# Altium PCB TP5400电源板-v1.1.pcbdoc
Units mil, origin at the board's own origin, x right, y up, seen from the top; angles counter-clockwise.
Board outline 629.92 x 807.09 mil, 2 copper layers (Top Layer, Bottom Layer), stack 62.205 mil thick; 18 components, 11 nets, 48 pads, 36 vias.
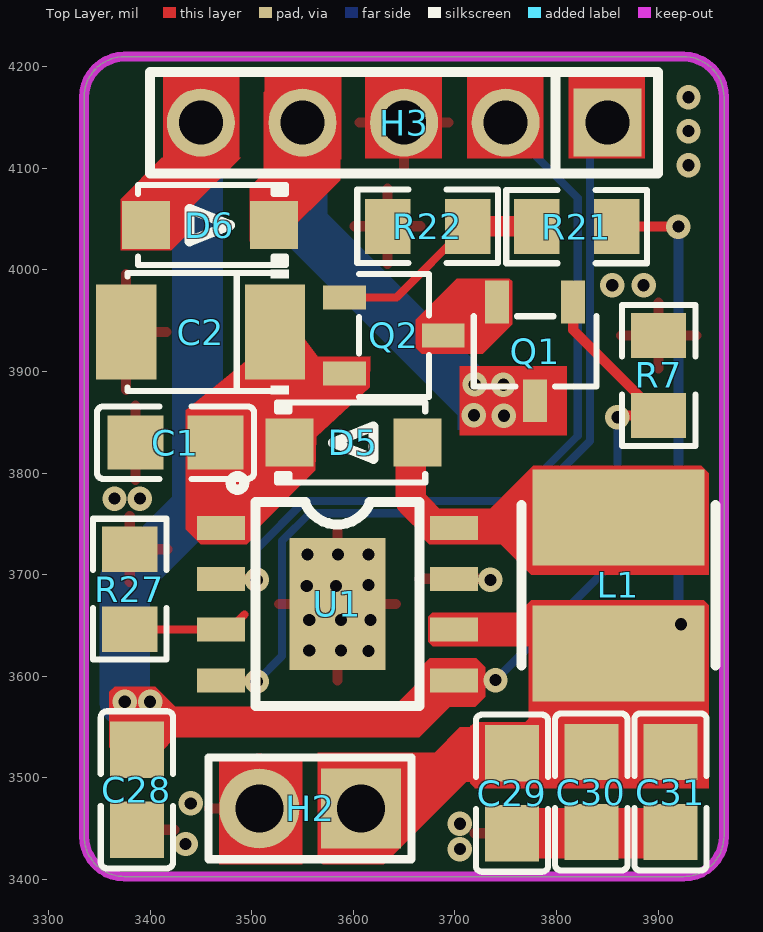
[diagram p0: Top Layer view]
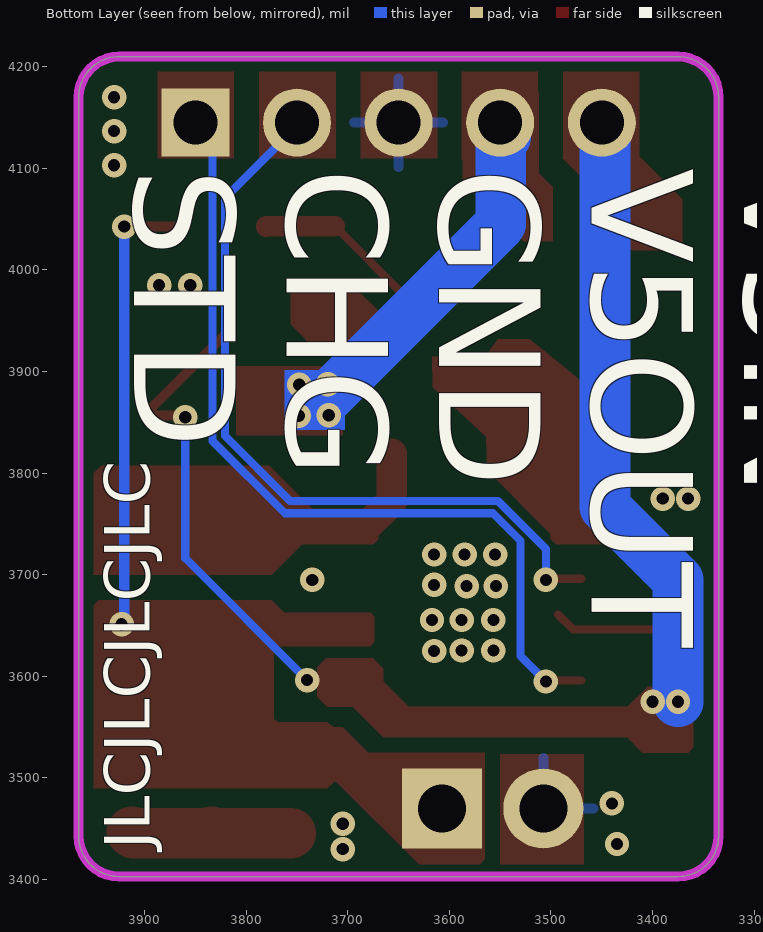
[diagram p1: Bottom Layer view, seen from below]

## Layer stack, top to bottom
Top Solder Mask Layer: solder mask 0.394, Dk 3.3
Top Layer: signal copper 1.378
Dielectric2: surface 59.449, FR4, Dk 4.5
Bottom Layer: signal copper 1.378
Bottom Solder Mask Layer: solder mask 0.394, Dk 3.3

## Board outline
3375,4210 3924.92,4210 cw(c3924.92,4170) 3964.92,4170 3964.92,3442.91 cw(c3924.92,3442.91) 3924.92,3402.91 3375,3402.91 cw(c3375,3442.91) 3335,3442.91 3335,4170 cw(c3375,4170)

## Design rules (kind name [scope] priority, off if disabled: settings)
BoardOutlineClearance copperThickness1oz [All] p0: genericclearance=10 ignorepadtopadclearanceinfootprint=FALSE except(0: Arc-SplitContinuation Track-SplitContinuation SMDPad-SplitContinuation THPad-SplitContinuation Via-SplitContinuation Fill-SplitContinuation Poly-SplitContinuation Region-SplitContinuation Text-SplitContinuation)
BoardOutlineClearance copperThickness2oz [All] p0: genericclearance=10 ignorepadtopadclearanceinfootprint=FALSE except(0: Arc-SplitContinuation Track-SplitContinuation SMDPad-SplitContinuation THPad-SplitContinuation Via-SplitContinuation Fill-SplitContinuation Poly-SplitContinuation Region-SplitContinuation Text-SplitContinuation)
BoardOutlineClearance Plane_innerPlane [All] p0: genericclearance=10 ignorepadtopadclearanceinfootprint=FALSE except(0: Arc-SplitContinuation Track-SplitContinuation SMDPad-SplitContinuation THPad-SplitContinuation Via-SplitContinuation Fill-SplitContinuation Poly-SplitContinuation Region-SplitContinuation Text-SplitContinuation)
BoardOutlineClearance Copper_copperRegion [All] p0: genericclearance=10 ignorepadtopadclearanceinfootprint=FALSE except(0: Arc-SplitContinuation Track-SplitContinuation SMDPad-SplitContinuation THPad-SplitContinuation Via-SplitContinuation Fill-SplitContinuation Poly-SplitContinuation Region-SplitContinuation Text-SplitContinuation)
BoardOutlineClearance otherClearance [All] p0: genericclearance=10 ignorepadtopadclearanceinfootprint=FALSE except(0: Arc-SplitContinuation Track-SplitContinuation SMDPad-SplitContinuation THPad-SplitContinuation Via-SplitContinuation Fill-SplitContinuation Poly-SplitContinuation Region-SplitContinuation Text-SplitContinuation)
Clearance copperThickness1oz [All] p1: gap=7 ignorepadtopadclearanceinfootprint=FALSE
Clearance copperThickness2oz [All] p1: gap=7 ignorepadtopadclearanceinfootprint=FALSE
Clearance Plane_innerPlane [All] p1: gap=7 ignorepadtopadclearanceinfootprint=FALSE
Clearance Copper_copperRegion [All] p1: gap=7 ignorepadtopadclearanceinfootprint=FALSE
Clearance otherClearance [All] p1: gap=7 ignorepadtopadclearanceinfootprint=FALSE
DiffPairsRouting differentialPair [All] p1: maxuncoupledlength=10 minlimit=6 maxlimit=Infinity mostfreqgap=6 toplayer_minwidth=5 toplayer_prefwidth=10 toplayer_maxwidth=100 bottomlayer_minwidth=5 bottomlayer_prefwidth=10 bottomlayer_maxwidth=100
PasteMaskExpansion pasteMaskExpansion [All] p1: expansion=0
PlaneConnect innerPlane [All] p1: planeconnectstyle=Relief reliefexpansion=20 reliefentries=4 reliefconductorwidth=10 reliefairgap=10
PolygonConnect copperRegion [All] p1: connectstyle=Relief reliefentries=4 reliefconductorwidth=10 polygonreliefangle="90 Angle" airgapwidth=10
RoutingVias viaSize [All] p1: viastyle="Through Hole" holewidth=12.0078 minholewidth=11.811 maxholewidth=248.0314 width=12.0078 minwidth=11.811 maxwidth=248.0314
SolderMaskExpansion solderMaskExpansion [All] p1: useseparateexpansions=TRUE expansion=2 expansionbottom=2
Width copperThickness1oz [All] p1: maxlimit=100 minlimit=5 preferedwidth=10
Width copperThickness2oz [All] p1: maxlimit=100 minlimit=8 preferedwidth=10

## Components (designator, comment, footprint, x,y, rotation, side; value= is the part's Value field where it differs from the comment)
C1 "" C0805_1 3425,3830 r0 top
C2 "" CASE-B_3528 3449.7,3938.89 r180 top
C28 "" C0805_1 3387.05,3488.37 r270 top
C29 "" C0805_1 3756.26,3485 r90 top
C30 "" C0805_1 3834.25,3486.18 r90 top
C31 "" C0805_1 3912.26,3486.18 r90 top
D5 "" SOD-123FL_L2.8-W1.8-LS3.7-RD 3600,3830 r0 top
D6 "" SOD-123FL_L2.8-W1.8-LS3.7-RD 3458.78,4044.08 r180 top
H2 "" HDR-TH_2P-P2.54-V-M_1 3557.48,3470 r180 top
H3 "" HDR-TH_5P-P2.54-V-M_1 3650,4145 r180 top
L1 "" IND-SMD_L4.5-W4.0_SCCD43 3861.04,3689.67 r270 top
Q1 "" SOT-23-3_L2.9-W1.6-P1.90-LS2.8-BR_1 3779.04,3920 r90 top
Q2 "" SOT-23-3_L2.9-W1.6-P1.90-LS2.8-BR_1 3640,3935.58 r180 top
R7 "" R0805_1 3900.57,3896.21 r270 top
R21 "" R0805_1 3819.88,4042.7 r180 top
R22 "" R0805_1 3673.23,4042.99 r180 top
R27 "" R0805_1 3380,3685.82 r270 top
U1 "" ESOP-8_L4.9-W3.9-P1.27-LS6.0-BL-EP 3584.43,3671.09 r270 top

## Footprints (in the part's own frame and the unit in brackets; to place one, negate y for a bottom-side part, rotate by r counter-clockwise, add the part's x,y. Pads: shape width x height; smd on the part's side, far side on the other; paste and mask are expansions set on the pad)
C0805_1 [mm]
  rect 1.41x1.35 smd: 1(-1,0) 2(1,0)
  silkscreen extent -1.96,-0.9 1.96,0.9
CASE-B_3528 [mil]
  rect 59.3x93.54 smd: 1(-73.25,0) 2(73.25,0)
  silkscreen extent -87,-61 72,61
ESOP-8_L4.9-W3.9-P1.27-LS6.0-BL-EP [mm]
  rect 0.6x1.2 smd: 1(-1.905,-2.908) 2(-0.635,-2.908) 3(0.635,-2.908) 4(1.905,-2.908) 5(1.905,2.908) 6(0.635,2.908) 7(-0.635,2.908) 8(-1.905,2.908)
  rect 3.3x2.4 smd: 9(0,0)
  silkscreen extent -3.2,-2.67 2.55,2.05
HDR-TH_2P-P2.54-V-M_1 [mm]
  rect 2x2 hole 1.2: 1(-1.27,0)
  round 2 hole 1.2: 2(1.27,0)
  silkscreen extent -2.54,-1.27 2.54,1.27
HDR-TH_5P-P2.54-V-M_1 [mm]
  rect 1.7x1.7 hole 1.1: 1(-5.08,0)
  round 1.7 hole 1.1: 2(-2.54,0) 3(0,0) 4(2.54,0) 5(5.08,0)
  silkscreen extent -6.35,-1.27 6.35,1.27
IND-SMD_L4.5-W4.0_SCCD43 [mm]
  rect 2.4x4.3 smd: 1(-1.7,0) 2(1.7,0)
  silkscreen extent -2,-2.43 2,2.43
R0805_1 [mm]
  rect 1.133x1.377 smd: 1(-1,0) 2(1,0)
  silkscreen extent -1.76,-0.92 1.76,0.92
SOD-123FL_L2.8-W1.8-LS3.7-RD [mm]
  rect 1.2x1.2 smd: 1(-1.6,0) 2(1.6,0)
  silkscreen extent -1.9,-1 1.8,1
SOT-23-3_L2.9-W1.6-P1.90-LS2.8-BR_1 [mm]
  rect 1.07x0.6 smd: 1(1.235,-0.95) 2(1.235,0.95) 3(-1.235,0)
  silkscreen extent -0.88,-1.54 0.88,1.54

## Via types
v1: diameter 24.02, hole 12.01, Top Layer to Bottom Layer, 36 vias

## Nets (pads, with @x,y where several pads share a name; then routed paths per layer and width w, separated by ;. In a path a pad name is that pad's centre, name@x,y a point inside that pad or via, vN(x,y) a via of type N, cw(c..) or ccw(c..) an arc to the next point about the centre after c; other vN are vias at no path point)
$1N374: D5.2 L1.1 U1.8 | length 83.8
  Top Layer w30: D5.2@3656.75,3819.3 3656.75,3772.19 U1.8@3682.7,3746.24
$1N391: R27.2 U1.3 | length 119.4
  Top Layer w8: R27.2 3380.36,3646.09 U1.3 3478.03,3646.09 3493.03,3661.09
$1N4929: Q2.1 R21.2 R22.1 | length 218.3
  Top Layer w8: Q2.1 3642.58,3972.98 R22.1
  Top Layer w20: R22.1 3780.21,4042.99 R21.2
BAT5V: C1.2 C2.1 D5.1 Q2.2 U1.1
BAT5V_OUT: Q1.2 Q2.3
CHRG: H3.2 U1.2 | length 767
  Top Layer w8: U1.2 3503.91,3696.09 v1(3505,3695)
  Bottom Layer w8: v1(3505,3695) 3505,3725.41 3552.17,3772.58 3756.76,3772.58 3820.99,3836.81 3820.99,4070.7 H3.2@3746.69,4145
GND: C1.1 C2.2 C28.2 C29.1 C30.1 C31.1 H2.2 H3.3 R7.1 R22.2 R27.1 U1.7 U1.9 | length 158.2
  Top Layer w50: C29.1 C30.1@3833.07,3445.63 ; C30.1 C30.1@3833.07,3445.63 ; C31.1 3911.08,3445.63 C30.1@3833.07,3445.63
  other v1: 3705,3430 3435,3435 3705,3455 3440,3475 3556.71,3625.5 3588.01,3625.5 3615,3625 3556.71,3655.47 3588.01,3655.47 3617.08,3655.47 3554.24,3688.88 3583.01,3688.88 3615,3690 3735,3695 3555,3720 3585,3720 3615,3720 3365,3775 3390,3775 3855,3985 3885.75,3985 3930,4103.13 3930,4136.67 3930,4170
STDBY: H3.1 U1.4 | length 846.2
  Top Layer w8: U1.4 3503.91,3596.09 v1(3505,3595)
  Bottom Layer w8: v1(3505,3595) 3530,3620 3530,3733.44 3557.14,3760.58 3761.73,3760.58 3832.99,3831.84 3832.99,4132.48 H3.1@3845.36,4144.85
USB5V: C28.1 D6.2 H3.5 Q1.1 R7.2 U1.5 | length 1114.1
  Top Layer w10: U1.5@3722.2,3595.65 3739.32,3595.65 v1(3740,3596.33) ; Q1.1 3816.44,3940.97 R7.2 3861.84,3856.84 v1(3860,3855)
  Bottom Layer w8: v1(3740,3596.33) 3860,3716.33 v1(3860,3855)
  Bottom Layer w50: v1(3375,3575) 3375,3695 3446.69,3766.69 H3.5@3446.69,4145
  other v1: 3400,3575
V5OUT: D6.1 H3.4 Q1.3 | length 329.6
  Bottom Layer w50: H3.4@3544.66,4130.89 3549.45,4126.1 3549.45,4045.45 3720.72,3874.19
  other v1: 3748.27,3856.49 3718.72,3857.02 3719.52,3887.36 3747.73,3887.09
VBAT: C29.2 C30.2 C31.2 H2.1 L1.2 R21.1 U1.6 | length 453.2
  Top Layer w10: R21.1 v1(3920,4042.7)
  Bottom Layer w10: v1(3920,4042.7) 3920,3653.89 v1(3922.61,3651.28)

## Polygon pours and split planes (outlines as drawn)
GND on Top Layer (solid, remove dead copper, pour order 0): 3000,4385 4150,4385 4150,3260 3000,3260
GND on Bottom Layer (solid, remove dead copper, pour order 2): 3185,4295 4490,4295 4490,3215 3185,3215

## Keep-outs
Board Outline Layer:
  the board outline again, w10

## Other copper
Top Layer:
  region net $1N374: 3942.62,3807.38 3950,3800 3950,3700 3775,3700 3745,3730 3675,3730 3670,3735 3670,3758.42 3676.58,3765 3735,3765 3777.38,3807.38
  region net VBAT: 3775,3675 3945,3675 3950,3670 3950,3490 3719.64,3490 3719.64,3490.36 3715,3495 3715,3551.31 3716.31,3551.31 3720,3555 3769.15,3555 3772.64,3558.49 3772.64,3629.7 3678.06,3629.7 3673.79,3633.97 3673.79,3658.79 3677.55,3662.55 3762.55,3662.55
  region net USB5V: 3365,3590 3405,3590 3425,3570 3640,3570 3665,3595 3665,3607.55 3675.18,3617.73 3721.1,3617.73 3730,3608.82 3730,3580 3720,3570 3695,3570 3665,3540 3425,3540 3410,3525 3365,3525 3360,3530 3360,3585
  region net VBAT: 3565,3525 3680,3525 3705,3550 3746.26,3550 3746.26,3504.46 3738.13,3496.33 3711.33,3496.33 3629.85,3414.85 3570.15,3414.85 3565,3420
  region net USB5V: 3411.71,4110.52 3370.91,4069.73 3370.91,4019.35 3420.67,4019.35 3437.04,4035.72 3437.04,4058.49 3489.07,4110.52
  region net BAT5V_OUT: 3753.56,3991.54 3756.35,3988.75 3756.35,3946.43 3727.61,3917.68 3667.32,3917.68 3661.73,3923.27 3661.73,3950.42 3661.34,3950.82 3701.92,3991.41 3726.19,3991.41 3726.32,3991.54
  region net V5OUT: 3705,3905 3810,3905 3810,3837.22 3705,3837.22
  region net V5OUT: 3498.22,4081.22 3512,4095 3512,4175 3527,4190 3572,4190 3587,4175 3587,4088.29 3526.81,4028.1 3498.22,4028.1
  region net BAT5V: 3495,3730 3500,3735 3500,3740 3562.71,3802.71 3563.51,3836.01 3616.43,3884.37 3616.83,3914.92 3564.92,3914.67 3552.39,3931.96 3520.81,3931.96 3435,3862.15 3435,3745 3450,3730
  region net USB5V: 3413,4195 3488,4195 3488,4110 3413,4110
  region net V5OUT: 3513,4195 3588,4195 3588,4108.87 3513,4108.87
  region net GND: 3612,4195 3687,4195 3687,4110 3612,4110
  region net CHRG: 3712,4195 3787,4195 3787,4110 3712,4110
  region net STDBY: 3812,4195 3887,4195 3887,4110 3812,4110
  region net GND: 3467.89,3523.37 3550,3523.37 3550,3415 3467.89,3415
Bottom Layer:
  region net V5OUT: 3702.96,3901.12 3761.82,3901.12 3761.82,3842.71 3702.96,3842.71

## Silkscreen, mask and mechanical layers (free items; w line width, h text height)
Bottom Silkscreen Layer:
  text "V5IN / V5OUT / GND / CHG / STD" at 3910,4100 h100 r90
  text "JLCJLCJLCJLC" at 3895,3430 h45 r270

## Dimensions
3335,3220 to 3965,3220 on Document Layer
4194.96,3398.21 to 4199.96,4208.21 on Document Layer